# Altium PCB SmartSwitchD2_MainBoard_1v2.PCBDOC
Units mm, origin at the board's own origin, x right, y up, seen from the top; angles counter-clockwise.
Board outline 70 x 77.6 mm, 2 copper layers (Top Layer, Bottom Layer), stack 1.443 mm thick; 53 components, 27 nets, 198 pads, 183 vias.
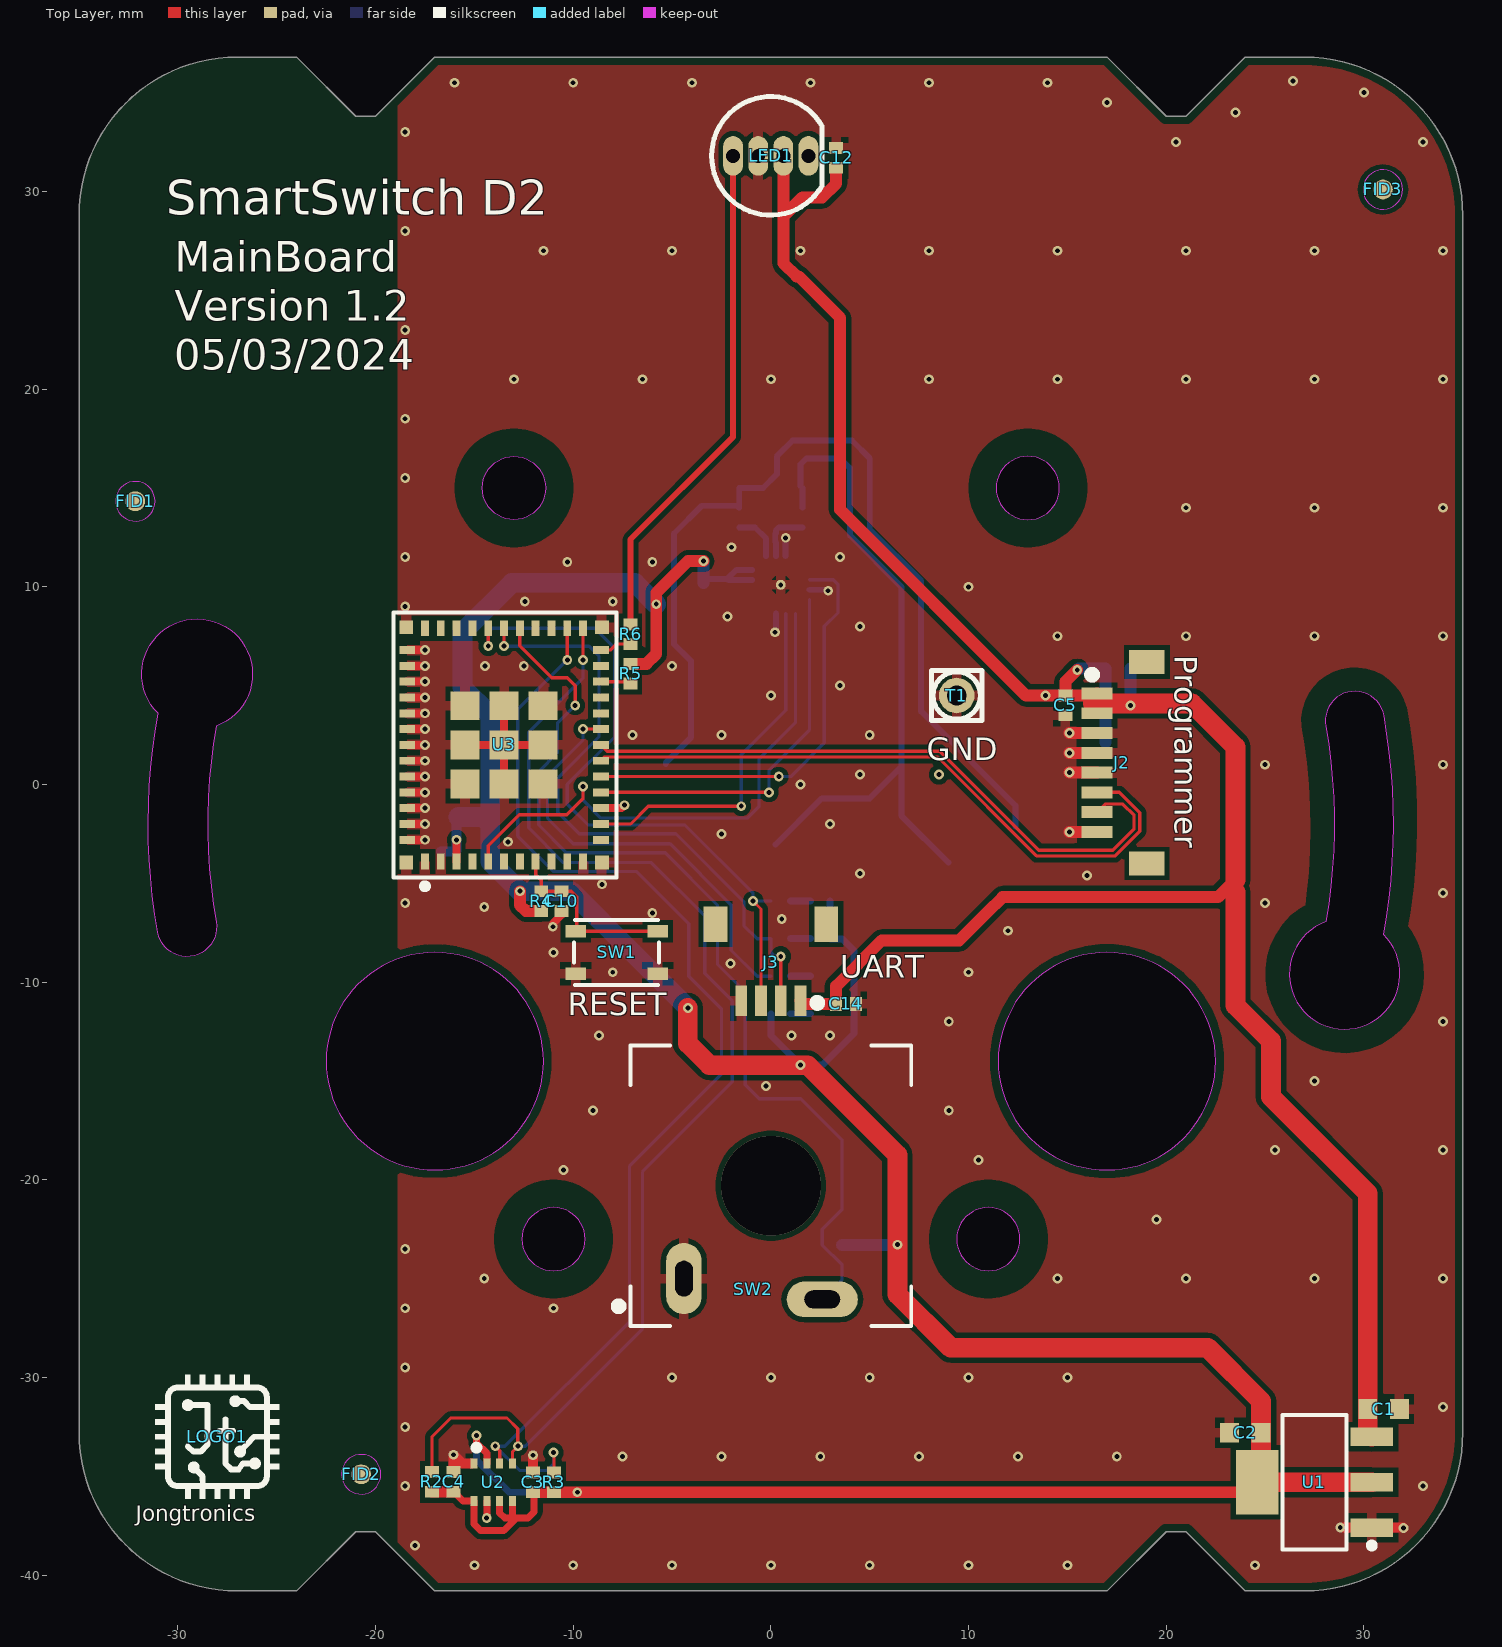
[diagram p0: Top Layer view]
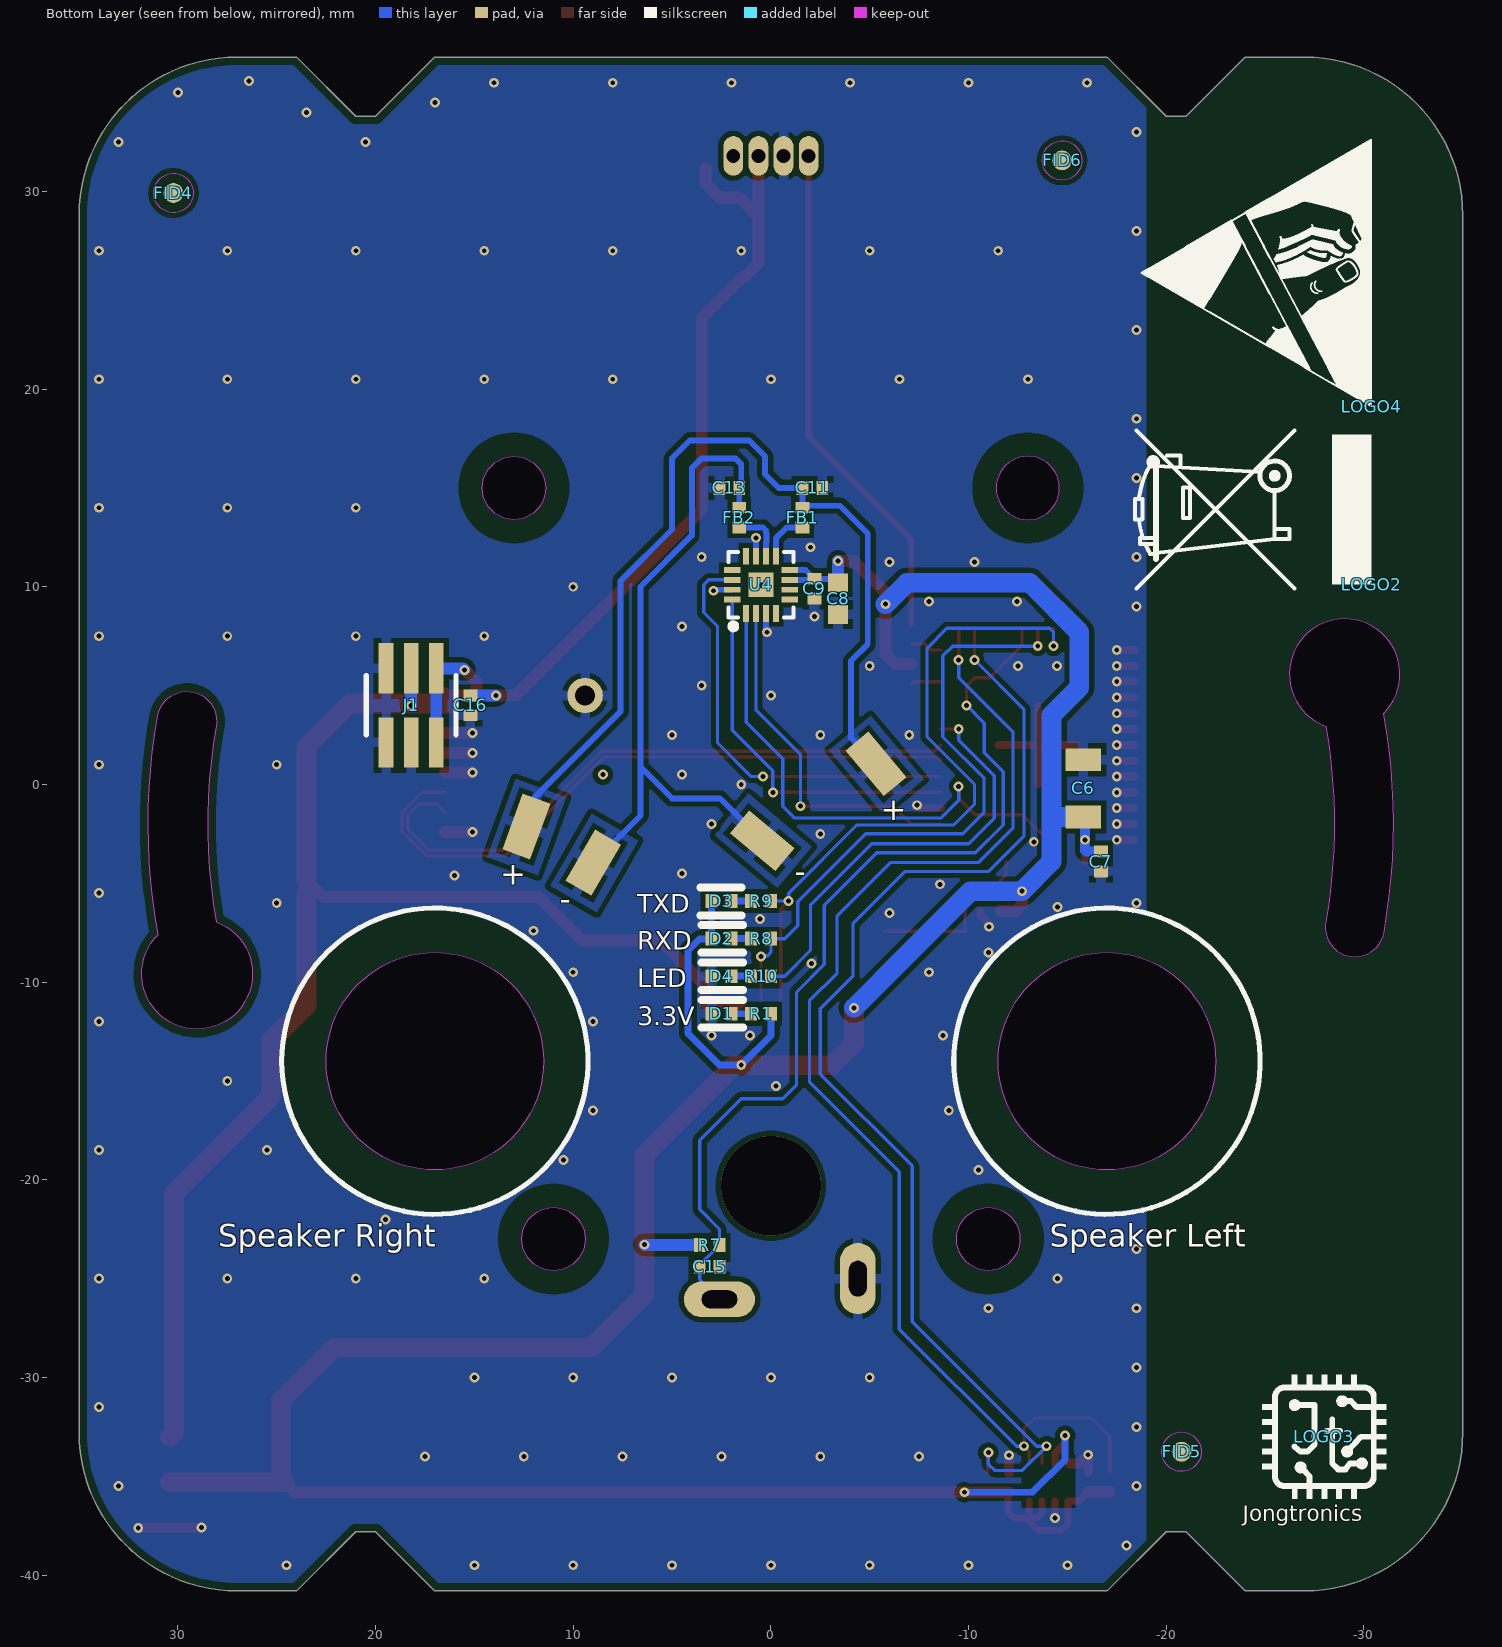
[diagram p1: Bottom Layer view, seen from below]
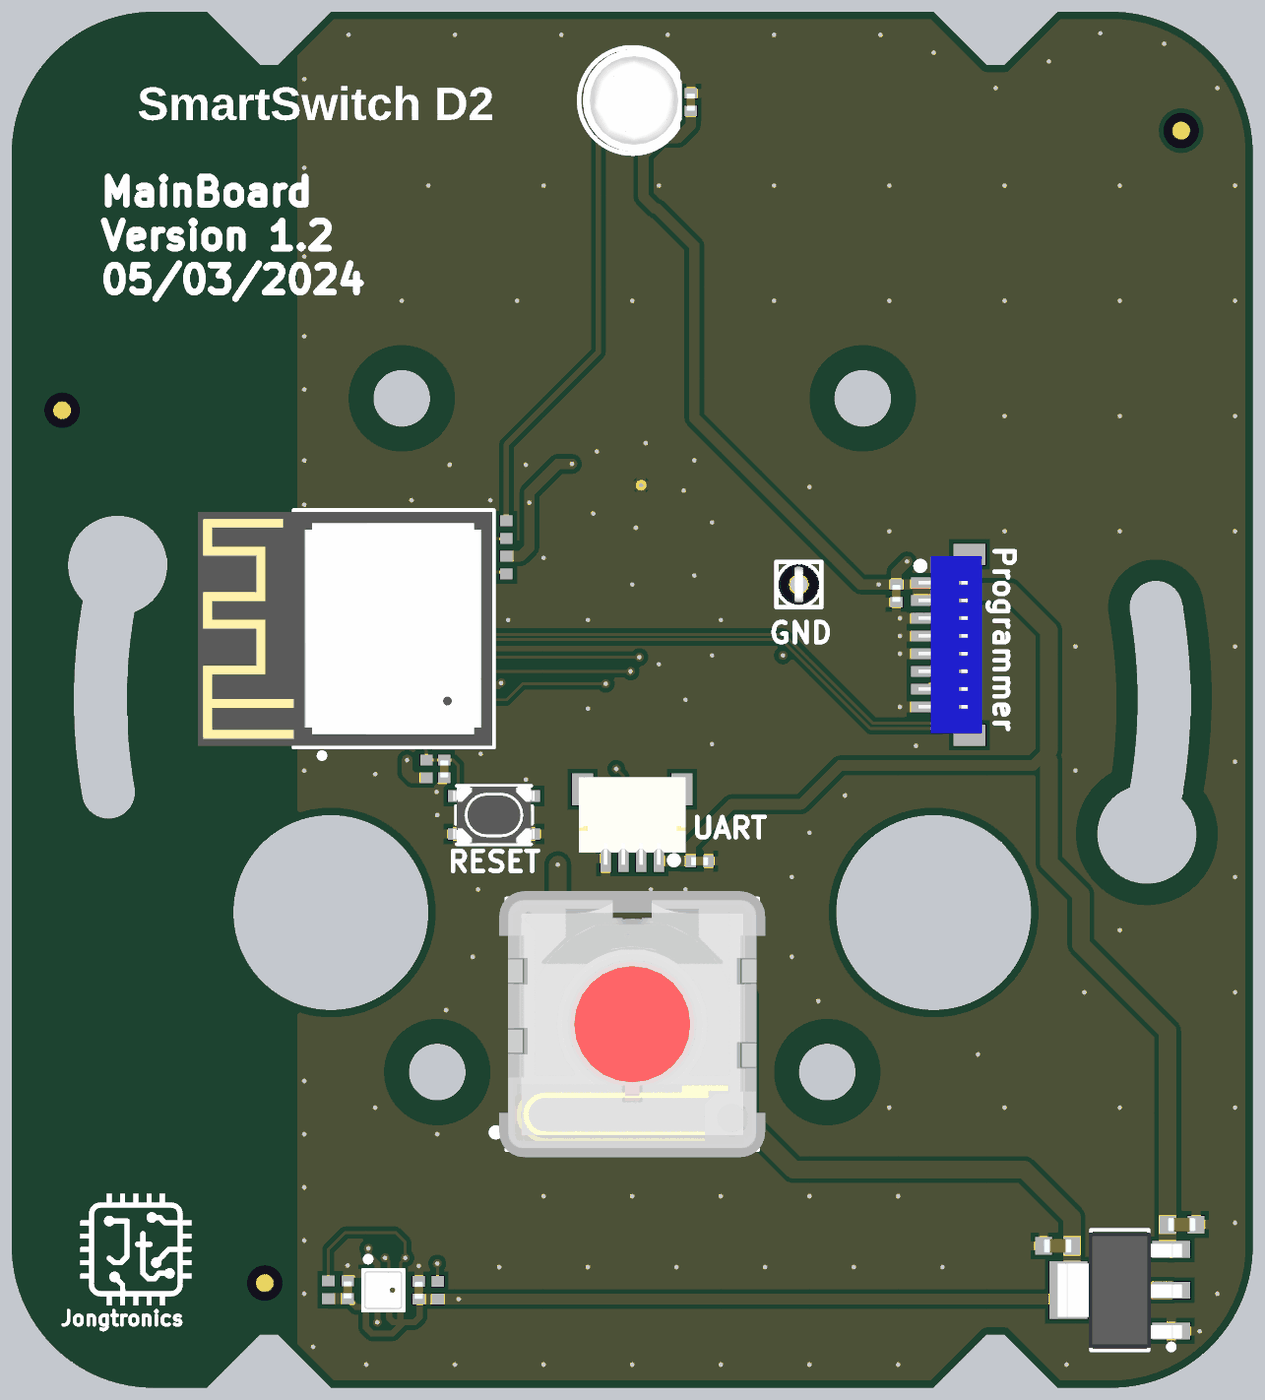
[diagram p2: 3D render of the assembled board from above, using the file's embedded part models]
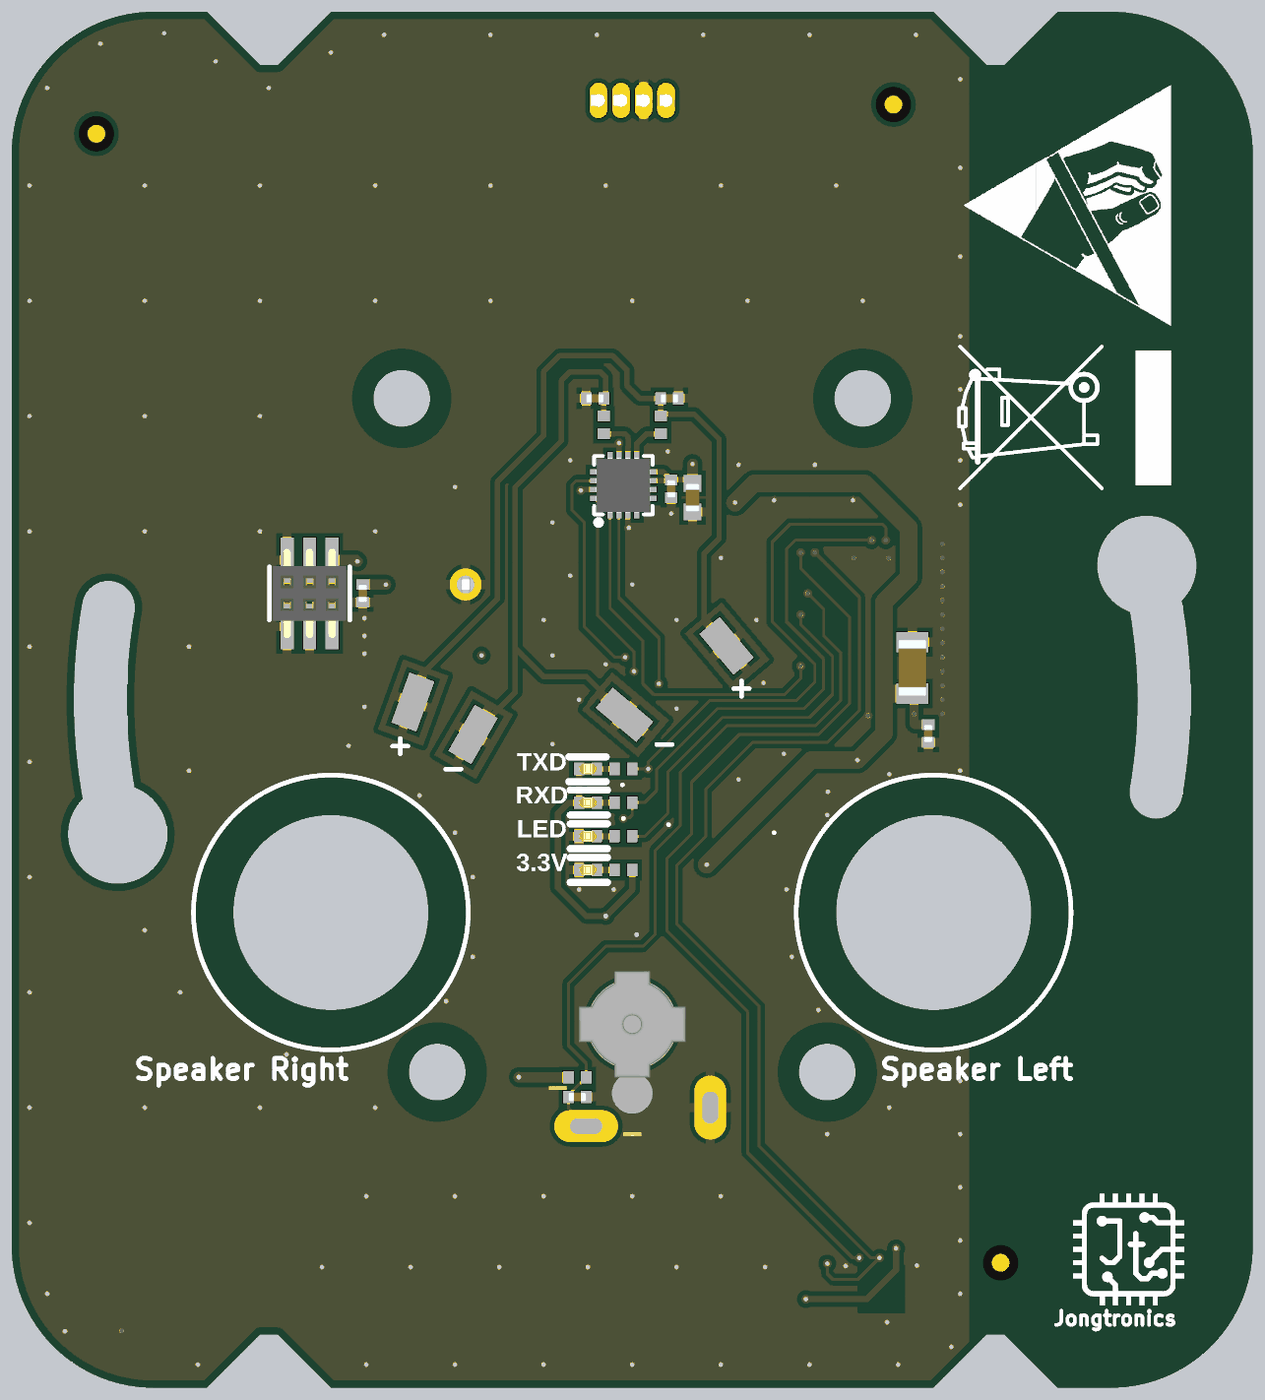
[diagram p3: 3D render of the assembled board from below, using the file's embedded part models]

## Layer stack, top to bottom
TopSolder: solder mask 0.0127, Solder Resist, Dk 3.8
Top Layer: signal copper 0.035
Dielectric 1: prepreg 0.0864, PP-011, Dk 4.29
Dielectric 2: core 1.2, FR-4, Dk 4.25
Dielectric 3: prepreg 0.0864, PP-011, Dk 4.29
Bottom Layer: signal copper 0.035
BottomSolder: solder mask 0.0127, Solder Resist, Dk 3.8

## Board outline
-27,-40.8 -24,-40.8 -21,-37.8 -20,-37.8 -17,-40.8 17,-40.8 20,-37.8 21,-37.8 24,-40.8 27,-40.8 ccw(c27,-32.8) 35,-32.8 35,28.8 ccw(c27,28.8) 27,36.8 24,36.8 21,33.8 20,33.8 17,36.8 -17,36.8 -20,33.8 -21,33.8 -24,36.8 -27,36.8 ccw(c-27,28.8) -35,28.8 -35,-32.8 ccw(c-27,-32.8)
cut-out: 11.5,-14 ccw(c17,-14) 17,-19.5 ccw(c17,-14) 22.5,-14 ccw(c17,-14) 17,-8.5 ccw(c17,-14)
cut-out: -22.5,-14 ccw(c-17,-14) -17,-19.5 ccw(c-17,-14) -11.5,-14 ccw(c-17,-14) -17,-8.5 ccw(c-17,-14)
cut-out: 11.4,15 ccw(c13,15) 13,13.4 ccw(c13,15) 14.6,15 ccw(c13,15) 13,16.6 ccw(c13,15)
cut-out: -13,13.4 cw(c-13,15) -14.6,15 cw(c-13,15) -13,16.6 cw(c-13,15) -11.4,15 cw(c-13,15)
cut-out: 9.4,-23 ccw(c11,-23) 11,-24.6 ccw(c11,-23) 12.6,-23 ccw(c11,-23) 11,-21.4 ccw(c11,-23)
cut-out: -12.6,-23 ccw(c-11,-23) -11,-24.6 ccw(c-11,-23) -9.4,-23 ccw(c-11,-23) -11,-21.4 ccw(c-11,-23)
cut-out: 28.067,-6.949 ccw(c29.027,-9.58) 31,-7.593 ccw(c0,-2) 31.021,3.47 ccw(c29.544,3.209) 28.067,2.949 cw(c0,-2)
cut-out: -31.021,-7.47 cw(c0,-2) -31,3.592 cw(c-29.027,5.579) -28.067,2.949 ccw(c0,-2) -28.067,-6.949 cw(c-29.544,-7.21)

## Design rules (kind name [scope] priority, off if disabled: settings)
BoardOutlineClearance [All] p1: gap=0.4 ignorepadtopadclearanceinfootprint=FALSE
Clearance ViaToPad [IsVia vs IsPad] p1: gap=0 ignorepadtopadclearanceinfootprint=FALSE except(0.254: SMDPad-Via)
Clearance [All] p2: gap=0.254 ignorepadtopadclearanceinfootprint=FALSE except(0.127: Arc-Arc Arc-Track Arc-SMDPad Arc-THPad Arc-Via Track-Track Track-SMDPad Track-THPad Track-Via SMDPad-SMDPad SMDPad-THPad)
ComponentClearance [All] p1: gap=0 collisioncheckmode=3 verticalgap=0 showdistances=TRUE checkcomponentboundary=TRUE
DiffPairsRouting DiffPairCAN [InDifferentialPair('CAN')] p1: maxlimit=0.165 minlimit=0.165 mostfreqgap=0.165 toplayer_minwidth=0.108 toplayer_maxwidth=0.108 toplayer_prefwidth=0.108 bottomlayer_minwidth=0.108 bottomlayer_maxwidth=0.108 bottomlayer_prefwidth=0.108 maxuncoupledlength=12.7 // 120Ohm
DiffPairsRouting DiffPairUSB [InDifferentialPair('ESP_USB')] p2: maxlimit=0.127 minlimit=0.127 mostfreqgap=0.127 toplayer_minwidth=0.206 toplayer_maxwidth=0.206 toplayer_prefwidth=0.206 bottomlayer_minwidth=0.206 bottomlayer_maxwidth=0.206 bottomlayer_prefwidth=0.206 maxuncoupledlength=12.7 // 90Ohm
FabricationTestPointUsage TestPointUsage [All] p1: valid=0 allowmultiple=FALSE
FabricationTestpoint Testpoint [All] p1: side=3 testpointundercomponent=TRUE minsize=1.016 maxsize=2.54 preferedsize=1.524 minholesize=0.508 maxholesize=1.016 preferedholesize=0.813 testpointgrid=0.025 allowsidetop=TRUE allowsidebottom=TRUE usegrid=TRUE gridtolerance=0
PlaneClearance [All] p1: clearance=0.254
PolygonConnect [All] p1: thpad.connectstyle=Relief thpad.reliefconductorwidth=0.508 thpad.reliefentries=4 thpad.polygonreliefangle="90 Angle" thpad.airgapwidth=0.254 smdpad.connectstyle=Relief smdpad.reliefconductorwidth=0.508 smdpad.reliefentries=4 smdpad.polygonreliefangle="90 Angle" smdpad.airgapwidth=0.254 via.connectstyle=Direct via.reliefconductorwidth=0.254 via.reliefentries=4 via.polygonreliefangle="90 Angle" via.airgapwidth=0.254
RoutingVias ViasPower [InNetClass('Power')] p1: holewidth=0.3 width=0.6 viastyle="Through Hole" minholewidth=0.25 minwidth=0.5 maxholewidth=0.3 maxwidth=0.6
RoutingVias Vias [All] p2: holewidth=0.25 width=0.5 viastyle="Through Hole" minholewidth=0.25 minwidth=0.5 maxholewidth=0.3 maxwidth=0.6
SilkToSolderMaskClearance SilkscreenOverComponentPads [IsPad] p1: minsilkscreentomaskgap=0.254 clearancetoexposedcopper=TRUE
SolderMaskExpansion SolderMaskExpansionVia [IsVia] p1: expansion=0 istentingtop=TRUE
SolderMaskExpansion [All] p2: expansion=0.051 istentingtop=FALSE
Width Width50Ohm [InNetClass('50Ohm')] p1: maxlimit=0.14 minlimit=0.14 preferedwidth=0.14 minimp=50.000000 maximp=50.000000 favimp=50.000000
Width WidthPower [InNetClass('Power')] p2: maxlimit=1.143 minlimit=0.203 preferedwidth=0.508 minimp=50.000000 maximp=50.000000 favimp=50.000000
Width [All] p3: maxlimit=1.143 minlimit=0.102 preferedwidth=0.165 minimp=50.000000 maximp=50.000000 favimp=50.000000
24 further rules are at their usual default settings.

## Classes and differential pairs
net class Power: GND P3V3A VCC
differential pair USB_D: +USB_D_P -USB_D_N

## Components (designator, comment, footprint, x,y, rotation, side; value= is the part's Value field where it differs from the comment)
C1 "CAP-0603 10uF 35VDC 20% X5R" C0603 31,-31.6 r180 top value=10uF
C2 "CAP-0603 10uF 35VDC 20% X5R" C0603 24,-32.8 r0 top value=10uF
C3 "CAP-0402 100nF 50VDC 10% X7R" C0402 -12.04,-35.306 r270 top value=100nF
C4 "CAP-0402 100nF 50VDC 10% X7R" C0402 -16.053,-35.281 r270 top value=100nF
C5 "CAP-0402 100nF 50VDC 10% X7R" C0402 14.9,4 r90 top value=100nF
C6 "CAP-1206 22uF 25VDC 10% X5R" C1206 -15.8,-0.2 r270 bottom value=22uF
C7 "CAP-0402 100nF 50VDC 10% X7R" C0402 -16.7,-3.9 r90 bottom value=100nF
C8 "CAP-0603 10uF 35VDC 20% X5R" C0603 -3.4,9.4 r90 bottom value=10uF
C9 "CAP-0402 100nF 50VDC 10% X7R" C0402 -2.2,9.9 r90 bottom value=100nF
C10 "CAP-0402 100nF 50VDC 10% X7R" C0402 -10.6,-5.9 r90 top value=100nF
C11 "CAP-0402 220pF 50VDC 10% X7R" C0402 -2.1,15 r0 bottom value=220pF
C12 "CAP-0402 100nF 50VDC 10% X7R" C0402 3.3,31.7 r270 top value=100nF
C13 "CAP-0402 220pF 50VDC 10% X7R" C0402 2.1,15 r180 bottom value=220pF
C14 "CAP-0402 100nF 50VDC 10% X7R" C0402 3.8,-11.1 r180 top value=100nF
C15 "CAP-0402 100nF 50VDC 10% X7R" C0402 3.1,-24.4 r0 bottom value=100nF
C16 "CAP-0402 100nF 50VDC 10% X7R" C0402 15.2,4 r90 bottom value=100nF
D1 "LED-0402 Red 1.8V 1mA" LED0402 2.5,-11.6 r180 bottom value=1mA
D2 "LED-0402 Red 1.8V 1mA" LED0402 2.5,-7.8 r0 bottom value=1mA
D3 "LED-0402 Yellow 1.9V 1mA" LED0402 2.5,-5.9 r0 bottom value=1mA
D4 "LED-0402 Blue 2.65V 2mA" LED0402 2.5,-9.7 r180 bottom value=2mA
FB1 "FB-0402 120R 0.55A 250mOhms" FB0402 -1.6,13.5 r90 bottom value=120Ohm
FB2 "FB-0402 120R 0.55A 250mOhms" FB0402 1.6,13.5 r90 bottom value=120Ohm
FID1 "Fiducial" FIDUCIAL -32.156,14.326 r90 top
FID2 "Fiducial" FIDUCIAL -20.726,-34.9 r90 top
FID3 "Fiducial" FIDUCIAL 30.963,30.099 r90 top
FID4 "Fiducial" FIDUCIAL 30.226,29.921 r90 bottom
FID5 "Fiducial" FIDUCIAL -20.777,-33.757 r90 bottom
FID6 "Fiducial" FIDUCIAL -14.732,31.572 r90 bottom
J1 "Header Female 2x3 - 4.6mm height - 0.05\" (1.27mm)" "HEADER FEMALE 2x3 1.27MM" 18.2,4 r0 bottom locked
J2 "PCB Connector JST SH1.0mm pitch SMD 1x8 Top Entry" BM08B-SRSS-TB 17.762,1.1 r270 top
J3 "PCB Connector JST SH1.0mm pitch SMD 1x4 Side Entry" SM04B-SRSS-TB 0,-9 r180 top locked
LED1 "LED RGB 256 Levels 5V 5mm" "WS2811 DIP" 0,31.8 r0 top locked
LOGO1 "Logo Jongtronics" LOGO_JONGTRONICS -28,-33 r0 top
LOGO2 "Logo Trash" LOGO_TRASH -30.4,10.1 r90 bottom
LOGO3 "Logo Jongtronics" LOGO_JONGTRONICS -28,-33 r180 bottom
LOGO4 "Logo ESD" LOGO_ESD -30.4,19.1 r90 bottom
R1 "RES-0402 2.2k 50V 1% 62.5mW" R0402 0.5,-11.6 r180 bottom value=2.2kOhm
R2 "RES-0402 2.2k 50V 1% 62.5mW" R0402 -17.145,-35.281 r270 top value=2.2kOhm
R3 "RES-0402 2.2k 50V 1% 62.5mW" R0402 -10.973,-35.306 r270 top value=2.2kOhm
R4 "RES-0402 10k 50V 1% 62.5mW" R0402 -11.616,-5.9 r270 top value=10kOhm
R5 "RES-0402 10k 50V 1% 62.5mW" R0402 -7.1,5.6 r90 top value=10kOhm
R6 "RES-0402 470R 50V 1% 62.5mW" R0402 -7.1,7.6 r270 top value=470Ohm
R7 "RES-0402 1k 50V 1% 125mW" R0402 3.1,-23.3 r0 bottom value=1kOhm
R8 "RES-0402 1k 50V 1% 125mW" R0402 0.5,-7.8 r0 bottom value=1kOhm
R9 "RES-0402 1k 50V 1% 125mW" R0402 0.5,-5.9 r0 bottom value=1kOhm
R10 "RES-0402 1k 50V 1% 125mW" R0402 0.5,-9.7 r180 bottom value=1kOhm
SW1 "Tactile Switch SMD/SMT PTS815" "SW PTS815 SJK 250" -7.8,-8.5 r180 top
SW2 "Gateron KS-27 Low Profile 2.0 Mechanical Switch Set" "GATERON KS-27" 0,-20.3 r0 top locked
T1 "PCB Test point BLACK 1mm hole" "TESTPIN BLACK 1MM" 9.4,4.5 r0 top
U1 "Linear LDO 3.3V 800mA" SOT-223-4 27.5,-35.3 r90 top
U2 "Digital Sensor Temperature,Humidity,Pressure" LGA-8 -14.046,-35.3 r90 top
U3 "2.4 GHz WiFi, Bluetooth 5 (LE), Zigbee and Thread module" ESP32-CX-MINI-1 -13.5,2 r90 top locked
U4 "Tiny, Low-Cost, PCM Class D Amplifier" TQFN-16 0.5,10.1 r90 bottom

## Footprints (in the part's own frame and the unit in brackets; to place one, negate y for a bottom-side part, rotate by r counter-clockwise, add the part's x,y. Pads: shape width x height; smd on the part's side, far side on the other; paste and mask are expansions set on the pad)
BM08B-SRSS-TB [mm]
  rect 0.6x1.55 smd: 1(-3.5,-1.262) 2(-2.5,-1.262) 3(-1.5,-1.262) 4(-0.5,-1.262) 5(0.5,-1.262) 6(1.5,-1.262) 7(2.5,-1.262) 8(3.5,-1.262)
  rect 1.2x1.8 smd: ""(-5.1,1.263) ""(5.1,1.263)
  silkscreen extent -4.65,-1.71 -4.25,-1.31, body extent -5,-1.63 5,1.97, height 4.25
C0402 [mm] "C0402"
  rect 0.6x0.7 smd: 1(-0.5,0) 2(0.5,0)
  body extent -0.5,-0.25 0.5,0.25, height 0.55
C0603 [mm] "C0603"
  rect 0.95x1 smd: 1(-0.8,0) 2(0.8,0)
  body extent -0.8,-0.4 0.8,0.4, height 0.87
C1206 [mm] "C1206"
  rect 1.15x1.8 smd: 1(-1.45,0) 2(1.45,0)
  body extent -1.6,-0.8 1.6,0.8, height 0.88
ESP32-CX-MINI-1 [mm]
  rect 0.8x0.4 smd: 1(-5.9,4) 2(-5.9,3.2) 3(-5.9,2.4) 4(-5.9,1.6) 5(-5.9,0.8) 6(-5.9,0) 7(-5.9,-0.8) 8(-5.9,-1.6) 9(-5.9,-2.4) 10(-5.9,-3.2) 11(-5.9,-4) 25(5.9,-4) 26(5.9,-3.2) 27(5.9,-2.4) 28(5.9,-1.6) 29(5.9,-0.8) 30(5.9,0) 31(5.9,0.8) 32(5.9,1.6) 33(5.9,2.4) 34(5.9,3.2) 35(5.9,4)
  rect 0.4x0.8 smd: 12(-4.8,-4.9) 13(-4,-4.9) 14(-3.2,-4.9) 15(-2.4,-4.9) 16(-1.6,-4.9) 17(-0.8,-4.9) 18(0,-4.9) 19(0.8,-4.9) 20(1.6,-4.9) 21(2.4,-4.9) 22(3.2,-4.9) 23(4,-4.9) 24(4.8,-4.9) 36(4.8,4.9) 37(4,4.9) 38(3.2,4.9) 39(2.4,4.9) 40(1.6,4.9) 41(0.8,4.9) 42(0,4.9) 43(-0.8,4.9) 44(-1.6,4.9) 45(-2.4,4.9) 46(-3.2,4.9) 47(-4,4.9) 48(-4.8,4.9)
  rect 1.45x1.45 smd: 49(-1.975,-1.975) 49(-1.975,0) 49(-1.975,1.975) 49(0,1.975) 49(0,0) 49(0,-1.975) 49(1.975,-1.975) 49(1.975,0) 49(1.975,1.975)
  rect 0.7x0.7 smd: 50(5.95,4.95) 51(5.95,-4.95) 52(-5.95,-4.95) 53(-5.95,4.95)
  silkscreen extent -7.3,-5.7 6.7,5.6, body extent -6.6,-5.6 6.6,11, height 2.4
FB0402 [mm]
  rect 0.6x0.7 smd: 1(-0.5,0) 2(0.5,0)
  body extent -0.55,-0.3 0.55,0.3, height 0.5
FIDUCIAL [mm]
  round 1 smd paste-1 mask+0.5: 1(0,0)
  Top Layer keep-out circle w0.01: c0,0 r1
"GATERON KS-27" [mm]
  oval 1.8x3.6 hole 0.9 slot 1.8 at 90 deg mask+0: 1(-4.4,-4.7)
  oval 3.6x1.8 hole 0.9 slot 1.8 at 0 deg mask+0: 2(2.6,-5.75)
  silkscreen extent -7.9,-7.1 7.1,7.1, body extent -7.5,-7.5 7.5,7.5, height 8.8
"HEADER FEMALE 2x3 1.27MM" [mm]
  rect 0.74x2.55 smd: 1(-1.27,-1.875) 2(-1.27,1.875) 3(0,-1.875) 4(0,1.875) 5(1.27,-1.875) 6(1.27,1.875)
  silkscreen extent -2.27,-1.5 2.27,1.5, body extent -2.08,-2.52 2.08,2.52, height 4.68
LED0402 [mm]
  rect 0.6x0.7 smd: 1(-0.5,0) 2(0.5,0)
  body extent -0.5,-0.3 0.5,0.3, height 0.2
LGA-8 [mm]
  rect 0.5x0.35 smd: 1(0.95,0.975) 2(0.95,0.325) 3(0.95,-0.325) 4(0.95,-0.975) 5(-0.95,-0.975) 6(-0.95,-0.325) 7(-0.95,0.325) 8(-0.95,0.975)
  silkscreen extent 1.6,0.7 1.9,1, body extent -1.25,-1.25 1.25,1.25, height 0.97
LOGO_ESD [mm]
  silkscreen extent 0,0 13.56,11.68
LOGO_JONGTRONICS [mm]
  silkscreen extent -3.15,-3.15 3.15,3.15
LOGO_TRASH [mm]
  silkscreen extent -0.18,0 7.82,11.97
R0402 [mm] "R0402"
  rect 0.6x0.7 smd: 1(-0.5,0) 2(0.5,0)
  body extent -0.55,-0.3 0.55,0.3, height 0.35
SM04B-SRSS-TB [mm]
  rect 0.6x1.55 smd: 1(-1.5,1.937) 2(-0.5,1.937) 3(0.5,1.937) 4(1.5,1.937)
  rect 1.2x1.8 smd: ""(-2.8,-1.937) ""(2.8,-1.937)
  silkscreen extent -2.55,1.85 -2.15,2.25, body extent -3,-2.64 3,2.31, height 2.96
SOT-223-4 [mm]
  rect 0.95x2.15 smd: 1(-2.3,-2.9) 2(0,-2.9) 3(2.3,-2.9)
  rect 3.25x2.15 smd: 4(0,2.9)
  silkscreen extent -3.4,-3.05 3.4,1.62, body extent -3.25,-3.5 3.25,3.5, height 1.68
"SW PTS815 SJK 250" [mm]
  rect 1.05x0.65 smd: 1(-2.075,1.075) 1(2.075,1.075) 2(-2.075,-1.075) 2(2.075,-1.075)
  silkscreen extent -2.15,-1.65 2.15,1.65, body extent -2.3,-1.6 2.3,1.6, height 2.5
"TESTPIN BLACK 1MM" [mm]
  round 1.8 hole 1 mask+0: 1(0,0)
  silkscreen extent -1.27,-1.27 1.27,1.27, body extent -1.15,-1.15 1.15,1.15, height 5
TQFN-16 [mm]
  rect 0.85x0.3 smd: 1(-1.45,0.75) 2(-1.45,0.25) 3(-1.45,-0.25) 4(-1.45,-0.75) 9(1.45,-0.75) 10(1.45,-0.25) 11(1.45,0.25) 12(1.45,0.75)
  rect 0.3x0.85 smd: 5(-0.75,-1.45) 6(-0.25,-1.45) 7(0.25,-1.45) 8(0.75,-1.45) 13(0.75,1.45) 14(0.25,1.45) 15(-0.25,1.45) 16(-0.75,1.45)
  rect 1.25x1.25 smd: 17(0,0)
  silkscreen extent -2.25,-1.65 1.65,1.65, body extent -1.55,-1.55 1.55,1.55, height 0.8
"WS2811 DIP" [mm]
  oval 1x2 hole 0.7: 1(1.9,0) 2(0.63,0) 3(-0.64,0) 4(-1.91,0)
  silkscreen extent -3,-3 2.59,3, body extent -2.8,-2.9 2.8,2.9, height 13.8

## Part data
C1 C2 C8: library part "C 0603 10uF 35V", Case-EIA=0603, Case-Metric=1608, Manufacturer 1="Murata Electronics", Manufacturer Part Number 1=GRM188R6YA106MA73D, Rated Voltage=35V, Supplier Part Number 1=81-GRM188R6YA106MA3D, Tolerance=20%, Datasheet=https://nl.mouser.com/datasheet/2/281/murata_03052018_GRM_Series_1-1310166.pdf, Default Designator=C?, Part Number="C 0603 10uF 35V", Supplier 1=Mouser
C3 C4 C5 C7 C9 C10 C12 C14 C15 C16: library part "C 0402 100nF 50V", Case-EIA=0402, Case-Metric=1005, Manufacturer 1="KYOCERA AVX", Manufacturer Part Number 1=04025C104KAT4A, Rated Voltage=50V, Supplier Part Number 1=581-04025C104KAT4A, Tolerance=10%, Datasheet=https://nl.mouser.com/datasheet/2/40/AVX_X7RDielectric_777024-1853642.pdf, Default Designator=C?, Part Number="C 0402 100nF 50V", Supplier 1=Mouser
C6: library part "C 1206 22uF 25V", "CAP-1206 47uF 16VDC 20% X5R", Case-EIA=1206, Case-Metric=3216, Manufacturer 1="Samsung Electro-Mechanics", Manufacturer Part Number 1=CL31A226KAHNNNE, Rated Voltage=25V, Supplier Part Number 1=187-CL31A226KAHNNNE, Tolerance=10%, Datasheet=https://nl.mouser.com/datasheet/2/585/MLCC-1837944.pdf, Default Designator=C?, Part Number="C 1206 22uF 25V", Supplier 1=Mouser
C11 C13: library part "C 0402 220pF 50V", Case-EIA=0402, Case-Metric=1005, Manufacturer 1="Murata Electronics", Manufacturer Part Number 1=GCM155R71H221KA37J, Rated Voltage=50V, Supplier Part Number 1=81-GCM155R71H221KA7J, Tolerance=10%, Datasheet=https://nl.mouser.com/datasheet/2/281/murata_03122018_GCM_Series-1310150.pdf, Default Designator=C?, Part Number="C 0402 220pF 50V", Supplier 1=Mouser
D1 D2: library part "LED 0402 Red", Case-EIA=0402, Case-Metric=1005, Manufacturer 1="Rohm Semiconductor", Manufacturer Part Number 1=SML-P11UTT86R, Rated Voltage=1.8V, Supplier Part Number 1=SML-P11UTT86RTR-ND, Datasheet=https://fscdn.rohm.com/en/products/databook/datasheet/opto/led/chip_mono/sml-p11-e.pdf, Default Designator=D?, Part Number="LED 0402 Red", Supplier 1=Digi-Key
D3: library part "LED 0402 Yellow", Case-EIA=0402, Case-Metric=1005, Manufacturer 1="Rohm Semiconductor", Manufacturer Part Number 1=SML-P11YTT86, Rated Voltage=1.9V, Supplier Part Number 1=846-SML-P11YTT86TR-ND, Datasheet=https://fscdn.rohm.com/en/products/databook/datasheet/opto/led/chip_mono/sml-p11-e.pdf, Default Designator=D?, Part Number="LED 0402 Yellow", Supplier 1=Digi-Key
D4: library part "LED 0402 Blue", Case-EIA=0402, Case-Metric=1005, Manufacturer 1=Kingbright, Manufacturer Part Number 1=APHHS1005LQBC/D-V, Rated Voltage=2.65V, Supplier Part Number 1=754-2122-2-ND, Datasheet=https://www.kingbrightusa.com/images/catalog/SPEC/APHHS1005LQBC-D-V.pdf, Default Designator=D?, Part Number="LED 0402 Blue", Supplier 1=Digi-Key
FB1 FB2: library part "FB 0402 120Ohm", Case-EIA=0402, Case-Metric=1005, Manufacturer 1="Murata Electronics", Manufacturer Part Number 1=BLM15AG121SN1D, Supplier Part Number 1=81-BLM15AG121SN1D, Tolerance=25%, Datasheet=https://nl.mouser.com/datasheet/2/281/ENFA0018-1915754.pdf, Default Designator=FB?, Part Number="FB 0402 120Ohm", Supplier 1=Mouser
J1: library part "Header Female 2x3 0.05\" (1.27mm)", Manufacturer 1=Harwin, Manufacturer Part Number 1=M50-3100345, Supplier Part Number 1=855-M50-3100345, Datasheet=https://nl.mouser.com/datasheet/2/181/M50_310-1221016.pdf, Default Designator=J?, Part Number="Header Female 2x3 0.05\" (1.27mm)", Supplier 1=Mouser
J2: library part "Conn 1x8 JST SH1.0 Top Entry", Manufacturer 1="JST Sales America Inc.", Manufacturer Part Number 1=BM08B-SRSS-TB, Supplier Part Number 1=455-1412-1-ND, Datasheet=https://media.digikey.com/pdf/Data%20Sheets/JST%20PDFs/SR%20Connector.pdf, Default Designator=J?, Part Number="Conn 1x8 JST SH1.0 Top Entry", Supplier 1=Digi-Key
J3: library part "Conn 1x4 JST SH1.0 Side Entry", Manufacturer 1="JST Sales America Inc.", Manufacturer Part Number 1=SM04B-SRSS-TB, Supplier Part Number 1=455-SM04B-SRSS-TBTR-ND, Datasheet=https://www.jst-mfg.com/product/pdf/eng/eSH.pdf, Default Designator=J?, Part Number="Conn 1x4 JST SH1.0 Side Entry", Supplier 1=Digi-Key
LED1: library part "LED WS2811", Default Designator=LED?, Part Number="LED WS2811"
R1 R2 R3: library part "R 0402 2.2kOhm", Case-EIA=0402, Case-Metric=1005, Manufacturer 1="Vishay / Dale", Manufacturer Part Number 1=CRCW04022K20FKEDC, Rated Voltage=50V, Supplier Part Number 1=71-CRCW04022K20FKEDC, Tolerance=1%, Datasheet=https://nl.mouser.com/datasheet/2/447/PYu-RC_Group_51_RoHS_L_10-1527934.pdf, Default Designator=R?, Part Number="R 0402 2.2kOhm", Supplier 1=Mouser
R4 R5: library part "R 0402 10kOhm", Case-EIA=0402, Case-Metric=1005, Manufacturer 1="Vishay / Dale", Manufacturer Part Number 1=CRCW040210K0FKEDC, Rated Voltage=50V, Supplier Part Number 1=71-CRCW040210K0FKEDC, Tolerance=1%, Datasheet=https://nl.mouser.com/datasheet/2/427/crcwce3-1223726.pdf, Default Designator=R?, Part Number="R 0402 10kOhm", Supplier 1=Mouser
R6: library part "R 0402 470Ohm", Case-EIA=0402, Case-Metric=1005, Manufacturer 1=Bourns, Manufacturer Part Number 1=CR0402-FX-4700GLF, Rated Voltage=50V, Supplier Part Number 1=652-CR0402FX-4700GLF, Tolerance=1%, Datasheet=https://nl.mouser.com/datasheet/2/54/cr-1858361.pdf, Default Designator=R?, Part Number="R 0402 470Ohm", Supplier 1=Mouser
R7 R8 R9 R10: library part "R 0402 1kOhm", Case-EIA=0402, Case-Metric=1005, Manufacturer 1=Yageo, Manufacturer Part Number 1=RC0402FR-7W1KL, Rated Voltage=50V, Supplier Part Number 1=603-RC0402FR-7W1KL, Tolerance=1%, Datasheet=https://nl.mouser.com/datasheet/2/447/PYu-RC_Group_51_RoHS_L_10-1527934.pdf, Default Designator=R?, Part Number="R 0402 1kOhm", Supplier 1=Mouser
SW1: library part "SW Tactile PTS815", Manufacturer 1=C&K, Manufacturer Part Number 1="PTS815 SJK 250 SMTR LFS", Supplier Part Number 1=611-PTS815SJK250SMTR, Datasheet=https://nl.mouser.com/datasheet/2/240/pts815-3050953.pdf, Default Designator=SW?, Part Number="SW Tactile PTS815", Supplier 1=Mouser
SW2: library part "Gateron KS-27", Manufacturer 1=Gateron, Manufacturer Part Number 1=KS-27, Datasheet=https://cdn.shopify.com/s/files/1/0565/8070/2297/files/SPEC-KS-27C10B050NN-X5-Low_Profile_Blue_Switch.pdf?v=1667274518, Default Designator=SW?, Part Number="Gateron KS-27"
T1: library part "Testpoint BLACK", Manufacturer 1="Keystone Electronics", Manufacturer Part Number 1=5001, Supplier Part Number 1=534-5001, Datasheet=https://nl.mouser.com/datasheet/2/215/000-5004-741320.pdf, Default Designator=T?, Part Number="Testpoint BLACK", Supplier 1=Mouser
U1: library part AMS1117, Manufacturer 1="Texas Instruments", Manufacturer Part Number 1=LM1117MPX-3.3/NOPB, Supplier Part Number 1=926-LM1117MPX3.3NOPB, Datasheet=https://www.ti.com/lit/ds/symlink/lm1117.pdf?HQS=dis-mous-null-mousermode-dsf-pf-null-wwe&ts=1663860104048&ref_url=https%253A%252F%252Fwww.mouser.fi%252F, Default Designator=U?, Part Number=AMS1117, Supplier 1=Mouser
U2: library part BME280, Manufacturer 1=Bosch, Supplier Part Number 1=262-BME280, Datasheet=https://www.mouser.com/datasheet/2/783/BST-BME280-DS002-1509607.pdf, Default Designator=U?, Manufacturer Part Number 1=BME280, Part Number=BME280, Supplier 1=Mouser
U3: library part ESP32-C6-MINI-1, Manufacturer 1="Espressif Systems", Manufacturer Part Number 1=ESP32-C6-MINI-1-N4, Supplier Part Number 1=356-ESP32C6MINI-1-N4, Datasheet=https://www.espressif.com/sites/default/files/documentation/esp32-c6-mini-1_mini-1u_datasheet_en.pdf, Default Designator=U?, Part Number=ESP32-C6-MINI-1, Supplier 1=Mouser
U4: library part MAX98357A, Manufacturer 1="Analog Devices", Manufacturer Part Number 1=MAX98357AETE+T, Supplier Part Number 1=700-MAX98357AETE+T, Datasheet=https://nl.mouser.com/datasheet/2/609/MAX98357A_MAX98357B-3131172.pdf, Default Designator=U?, Part Number=MAX98357A, Supplier 1=Mouser
FID1 FID2 FID3 FID4 FID5 FID6: Default Designator=FID?, Part Number=Fiducial
LOGO1 LOGO3: Default Designator=LOGO?, Part Number="Logo Jongtronics"
LOGO2: Default Designator=LOGO?, Part Number="Logo Trash"
LOGO4: Default Designator=LOGO?, Part Number="Logo ESD"

## Free pads (board coordinates)
  rect 1.5x3 smd far side rot 140: ""(-5.319,1.042)
  rect 1.5x3 smd far side rot 130: ""(0.437,-2.848)
  round 0.5 hole 0.25: ""(0.5,10.1)
  rect 1.5x3 smd far side rot 30: ""(8.983,-3.958)
  rect 1.5x3 smd far side rot 20: ""(12.373,-2.13)

## Via types
v1: diameter 0.5, hole 0.25, Top Layer to Bottom Layer, tented both sides, 182 vias
v2: diameter 5.05, hole 5.05, Top Layer to Bottom Layer, 1 vias

## Nets (pads, with @x,y where several pads share a name; then routed paths per layer and width w, separated by ;. In a path a pad name is that pad's centre, name@x,y a point inside that pad or via, vN(x,y) a via of type N, cw(c..) or ccw(c..) an arc to the next point about the centre after c; other vN are vias at no path point)
BCLK: U3.15 U4.16 | length 19.1
  Top Layer w0.165: U3.15 v1(-0.1,-0.4)
  Bottom Layer w0.165: v1(-0.1,-0.4) -0.1,0.7 1.95,2.75 U4.16
BUTTON: C15.2 R7.1 SW2.2 U3.29 | length 48.1
  Top Layer w0.165: U3.29 -12.7,7.017 -11.083,5.4 -10.3,5.4 -9.9,5 v1(-9.9,4)
  Bottom Layer w0.165: v1(-9.9,4) -10.8,3.1 -10.8,1.6 -11.75,0.65 -11.75,-2.05 -10.35,-3.45 -5.35,-3.45 -2.7,-6.1 -2.7,-9.1 -1.3,-10.5 -1.3,-15.2 -0.6,-15.9 1.5,-15.9 3.6,-18 3.6,-21.5 2.6,-22.5 R7.1 3.6,-24.3 C15.2 3.6,-25.05 SW2.2
DIN: U3.5 U4.1 | length 27.9
  Top Layer w0.165: U3.5 -14.3,-3.1 -12.727,-1.527 -10.327,-1.527 -9.5,-0.7 v1(-9.5,-0.1)
  Bottom Layer w0.165: v1(-9.5,-0.1) -9.5,-0.8 -8.6,-1.7 -1.2,-1.7 -0.6,-1.1 -0.6,1.3 1.25,3.15 U4.1
EN: C10.2 R4.1 SW1.2 U3.8 | length 9.5
  Top Layer w0.165: U3.8 -11.9,-4.568 -11.616,-4.852 R4.1 C10.2 -10.1,-5.4 -9.816,-5.684 -9.816,-7.366 -9.875,-7.425 SW1.2@-5.725,-7.425
GAIN: U3.13 U4.2 | length 18.2
  Top Layer w0.165: U3.13 -7.1,-2 -6.2,-1.1 v1(-1.5,-1.1)
  Bottom Layer w0.165: v1(-1.5,-1.1) -1.5,1.5 0.75,3.75 U4.2
GND: C1.1 C2.1 C3.1 C4.1 C5.1 C6.1 C7.1 C8.1 C9.1 C10.1 C11.1 C12.1 C13.1 C14.1 C15.1 C16.1 D1.1 D4.1 J1.4 J1.5 J1.6 J2.3 J2.4 J2.5 J2.8 J3.4 LED1.3 pad.@0.5,10.1 SW1.1 SW2.1 T1.1 U1.1 U2.1 U2.7 U3.1 U3.2 U3.11 U3.14 U3.36 U3.37 U3.38 U3.39 U3.40 U3.41 U3.42 U3.43 U3.44 U3.45 U3.46 U3.47 U3.48 U3.49 U3.50 U3.51 U3.52 U3.53 U4.3 U4.11 U4.15 U4.17 | length 37.3
  Top Layer w0.35: v1(-14.376,-37.109) -14.371,-37.104 U2.7
  Top Layer w0.4: U3.48 v1(-17.496,-2.8) ; U3.47 v1(-17.496,-2) ; U3.46 v1(-17.496,-1.2) ; U3.45 v1(-17.496,-0.4) ; U3.44 v1(-17.496,0.4) ; U3.43 v1(-17.496,1.2) ; U3.42 v1(-17.496,2) ; U3.41 v1(-17.496,2.8) ; U3.40 v1(-17.496,3.6) ; U3.39 v1(-17.496,4.4) ; U3.38 v1(-17.496,5.2) ; U3.37 v1(-17.496,6) ; U3.36 v1(-17.496,6.8) ; U3.49@-15.475,2 U3.49@-13.5,2 ; U3.49@-13.5,0.025 U3.49@-13.5,2 ; U3.49@-13.5,3.975 U3.49@-13.5,2 ; U3.49@-11.525,2 U3.49@-13.5,2 ; v1(-11.033,-7.197) -11,-7.164 -11,-7 -10.6,-6.6 C10.1 ; U3.14 -7.55,-1.2 v1(-7.4,-1.05)
  Top Layer w0.5: C4.1 v1(-16.053,-33.909) -15.612,-34.35 U2.1@-15.138,-34.35 ; C3.1 v1(-12.04,-33.934) ; v1(28.804,-37.592) 28.812,-37.6 U1.1 31.987,-37.6 v1(32.004,-37.617)
  Top Layer w0.6: v1(15.1,-2.4) J2.8 ; v1(15.1,0.6) J2.5 ; v1(15.1,1.6) J2.4 ; v1(15.1,2.6) J2.3
  Bottom Layer w0.3: v1(0.2,7.7) 0.25,7.75 U4.3 ; U4.11 0.75,12.25 v1(0.75,12.479) 0.779,12.479 v1@0.8,12.5 ; U4.15 2.85,9.85 v1(2.9,9.8)
  other v1: -15,-39.5 -10,-39.5 -5,-39.5 0,-39.5 5,-39.5 10,-39.5 15,-39.5 24.5,-39.5 -18,-38.5 -18.5,-35.5 33,-35.5 -7.5,-34 -2.5,-34 2.5,-34 7.5,-34 12.5,-34 17.5,-34 -18.5,-32.5 34,-31.5 -5,-30 0,-30 5,-30 10,-30 15,-30 -18.5,-29.5 -18.5,-26.5 -11,-26.5 -14.5,-25 14.5,-25 21,-25 27.5,-25 34,-25 -18.5,-23.5 19.5,-22 -10.5,-19.5 10.5,-19 25.5,-18.5 34,-18.5 -9,-16.5 9,-16.5 -0.25,-15.25 27.5,-15 -8.7,-12.7 1.05,-12.7 3,-12.7 9,-12 34,-12 -8,-9.5 10,-9.5 -2.05,-9.05 -11,-8.5 12,-7.4 0.55,-6.8 -6,-6.5 -14.5,-6.2 -18.5,-6 25,-6 34,-5.5 -8.55,-5.05 16,-4.6 4.5,-4.5 -13.3,-2.9 -2.5,-2.5 3,-2 1.5,0 4.5,0.5 25,1 34,1 -7,2.5 -2.5,2.5 5,2.5 0,4.5 3.5,5 -14.466,5.99 -12.5,6 -5,6 14.5,7.5 21,7.5 27.5,7.5 34,7.5 4.5,8 -2.2,8.5 -18.5,9 -12.45,9.25 -8,9.25 10,10 -10.3,11.25 -6,11.25 -18.5,11.5 3.5,11.5 -2,12 21,14 27.5,14 34,14 -18.5,15.5 -18.5,18.5 -13,20.5 -6.5,20.5 0,20.5 8,20.5 14.5,20.5 21,20.5 27.5,20.5 34,20.5 -18.5,23 -11.5,27 -5,27 1.5,27 8,27 14.5,27 21,27 27.5,27 34,27 -18.5,28 20.5,32.5 33,32.5 -18.5,33 23.5,34 17,34.5 30,35 -16,35.5 -10,35.5 -4,35.5 2,35.5 8,35.5 14,35.5 26.404,35.595
GPIO8: R5.1 U3.22 | length 1.5
  Top Layer w0.165: U3.22 -7.2,5.2 R5.1
LED: R10.2 U3.19 | length 22.1
  Top Layer w0.165: v1(-9.504,2.8) U3.19
  Bottom Layer w0.165: v1(-9.504,2.8) -9.504,2.246 -11.3,0.45 -11.3,-1.7 -10,-3 -5.1,-3 -2,-6.1 -2,-8.4 -0.7,-9.7 R10.2
LRCLK: U3.16 U4.14 | length 21.8
  Top Layer w0.165: U3.16 v1(0.4,0.4)
  Bottom Layer w0.165: v1(0.4,0.4) 1,0.4 2.7,2.1 2.7,8 3.4,8.7 3.4,10.1 3.15,10.35 U4.14
NetD1_2: D1.2 R1.1 | length 1
  Bottom Layer w0.35: R1.1 D1.2
NetD2_1: D2.1 R8.2 | length 1
  Bottom Layer w0.35: R8.2 D2.1
NetD3_1: D3.1 R9.2 | length 1
  Bottom Layer w0.35: R9.2 D3.1
NetD4_2: D4.2 R10.1 | length 1
  Bottom Layer w0.35: R10.1 D4.2
OUTN_R: FB2.1 U4.10 | length 2.7
  Bottom Layer w0.3: U4.10 0.25,12.231 0.221,12.26 0.221,12.698 0.25,12.727 0.25,12.85 0.4,13 0.523,13 0.531,13.008 0.969,13.008 0.977,13 FB2.1
OUTN_R_F: C13.2 FB2.2 pad.@0.437,-2.848 pad.@8.983,-3.958 | length 35.1
  Bottom Layer w0.3: pad.@0.233,-3.044 2.577,-0.7 5,-0.7 6.6,0.9 ; FB2.2 C13.2 1.5,15.1 1.5,16.2 1.8,16.5 3.5,16.5 4,16 4,12.6 6.6,10 6.6,0.9 ; pad.@8.983,-3.958 6.6,-1.575 6.6,0.9
OUTP_R: FB1.1 U4.9 | length 2.5
  Bottom Layer w0.3: FB1.1 -0.8,13 -0.25,12.45 U4.9
OUTP_R_F: C11.2 FB1.2 pad.@12.373,-2.13 pad.@-5.319,1.042 | length 47.6
  Bottom Layer w0.3: pad.@-5.319,1.042 -5.319,1.098 -4.05,2.367 -4.05,6.25 -4.9,7.1 -4.9,12.7 -3.5,14.1 -1.7,14.1 FB1.2 C11.2 ; C11.2 -0.4,15 0.3,15.7 0.3,16.6 1.1,17.4 4.1,17.4 5,16.5 5,12.9 7.6,10.3 7.6,3.7 12.373,-1.073 pad.@12.373,-2.13
P3V3A: C2.2 C3.2 C4.2 C6.2 C7.2 C8.2 C9.2 D2.2 D3.2 R1.2 R2.2 R3.2 R4.2 R5.2 R7.2 U1.2 U1.4 U2.2 U2.5 U2.6 U2.8 U3.3 U4.7 U4.8 | length 181.6
  Top Layer w0.35: C4.2 -16.003,-35.781 -15.878,-35.906 -15.878,-35.956 -15.583,-36.25 U2.8 -15.021,-37.404 -14.681,-37.744 -13.513,-37.744 -12.878,-37.109 ; v1(-14.884,-32.944) -14.884,-33.321 -14.371,-33.834 U2.2 ; U2.6 -13.721,-36.85 -13.462,-37.109 -13.117,-37.109 ; U2.5 -13.071,-37.064 -13.117,-37.109 ; C3.2 -11.989,-35.857 -11.989,-36.805 -12.294,-37.109 -12.878,-37.109 ; -13.117,-37.109 -12.878,-37.109
  Top Layer w0.4: U3.3 v1(-15.9,-2.8)
  Top Layer w0.6: R2.2 C4.2 ; v1(-12.7,-5.4) -12.7,-6.1 -12.4,-6.4 R4.2 ; C3.2 R3.2 24.094,-35.806 U1.4 ; R5.2 -6.3,6.1 -5.8,6.6 v1(-5.8,9.12) -5.8,9.7 -4.2,11.3 v1(-3.4,11.3)
  Top Layer w1: v1(-4.2,-11.3) -4.2,-13.1 -3.1,-14.2 v1(1.5,-14.2) 1.851,-14.2 6.4,-18.749 v1(6.4,-23.283) 6.4,-25.8 9.1,-28.5 22.1,-28.5 24.8,-31.2 C2.2 24.8,-35.1 U1.4 U1.2
  Bottom Layer w0.3: C8.2@-3.2,10.4 C9.2 ; U4.7 -2.15,10.35 C9.2 ; U4.8 -1.75,10.85 C9.2
  Bottom Layer w0.35: v1(-14.884,-32.944) -14.884,-34.166 -13.244,-35.806 v1(-9.794,-35.806) ; R1.2 0,-12.7 v1(1.5,-14.2) 2.6,-14.2 4.2,-12.6 4.2,-8.4 3.62,-7.82 3.02,-7.82 D2.2 D3.2
  Bottom Layer w0.5: C7.2 -15.95,-3.4 -15.9,-3.35 v1(-15.9,-2.8) -15.9,-1.75 C6.2
  Bottom Layer w0.6: C8.2 v1(-3.4,11.3) ; R7.2 6.383,-23.3 v1(6.4,-23.283)
  Bottom Layer w1: C6.2 -14.55,-1.65 -14.2,-2 ; v1(-5.8,9.12) -6.88,10.2 -13.1,10.2 -15.6,7.7 -15.6,4.9 -14.2,3.5 -14.2,-2 ; v1(-4.2,-11.3) -7,-8.5 -10.1,-5.4 v1(-12.7,-5.4) -14.2,-3.9 -14.2,-2
RGB_LED: R6.2 U3.24 | length 1.6
  Top Layer w0.165: U3.24 -8.117,6.8 -7.817,7.1 R6.2
RGB_LED_DIN: LED1.4 R6.1 | length 25.8
  Top Layer w0.3: R6.1 -7.1,12.4 -1.91,17.59 LED1.4
RXD: J3.2 R8.1 U3.30 | length 32.3
  Top Layer w0.165: v1(-13.5,6.996) U3.30 ; J3.2 v1(0.5,-8.7)
  Bottom Layer w0.165: v1(-13.5,6.996) -9.196,6.996 -8.7,6.5 -8.7,2.4 -10.787,0.313 -10.787,-1.413 -9.7,-2.5 -4.8,-2.5 -1.362,-5.938 -1.362,-7.138 -0.7,-7.8 R8.1 0,-8.5 0.163,-8.663 0.463,-8.663 v1(0.5,-8.7)
SCL: R2.1 U2.4 U3.25 | length 62.7
  Top Layer w0.165: R2.1 -17.145,-32.995 -16.2,-32.05 -13.35,-32.05 -12.802,-32.598 v1(-12.802,-33.477) -13.071,-33.747 U2.4 ; v1(-9.5,6.3) U3.25
  Bottom Layer w0.165: v1(-12.802,-33.477) -12.427,-33.477 -6.5,-27.55 -6.5,-19.6 -1.95,-15.05 -1.95,-10.95 -3.35,-9.55 -3.35,-6.65 -6.05,-3.95 -10.5,-3.95 -12.25,-2.2 -12.25,2.65 -9.5,5.4 v1(-9.5,6.3)
SDA: R3.1 U2.3 U3.26 | length 60.3
  Top Layer w0.165: v1(-13.945,-33.477) -13.721,-33.701 U2.3 ; v1(-11,-33.8) -10.973,-33.827 R3.1 ; v1(-10.3,6.3) U3.26
  Bottom Layer w0.165: v1(-11,-33.8) -11,-34.383 -11.322,-34.705 -12.717,-34.705 v1(-13.945,-33.477) -13.454,-33.477 -7.15,-27.173 -7.15,-19.3 -2.5,-14.65 -2.5,-11.35 -4.15,-9.7 -4.15,-7.05 -6.8,-4.4 -11.013,-4.4 -12.8,-2.613 -12.8,3.8 v1(-10.3,6.3)
TXD: J3.3 R9.1 U3.31 | length 35.2
  Top Layer w0.165: v1(-14.3,6.996) -14.3,7 U3.31 ; v1(-0.9,-5.9) -0.5,-6.3 J3.3
  Bottom Layer w0.165: v1(-14.3,6.996) -14.3,7.7 -14.1,7.9 -8.9,7.9 -7.9,6.9 -7.9,2.4 -10.3,0 -10.3,-1 -9.25,-2.05 -4.35,-2.05 -0.9,-5.5 v1(-0.9,-5.9) R9.1
USB_D_N: J2.6 U3.17 | length 33.5
  Top Layer w0.165: U3.17 -8.407,1.393 -8.404,1.39 8.43,1.39 13.435,-3.615 17.418,-3.615 18.665,-2.368 18.665,-1.432 17.633,-0.4 J2.6
USB_D_P: J2.7 U3.18 | length 32.6
  Top Layer w0.165: U3.18 -8.283,1.683 8.551,1.683 13.556,-3.323 17.297,-3.323 18.373,-2.247 18.373,-1.553 17.81,-0.99 16.91,-0.99 J2.7
VCC: C1.2 C5.2 C12.2 C14.2 C16.2 J1.1 J1.2 J1.3 J2.1 J2.2 J3.1 LED1.2 U1.3 | length 120.6
  Top Layer w0.6: LED1.2 0.63,28.73 ; J3.1 1.663,-11.1 C14.2 3.3,-10.2 5.608,-7.892 9.532,-7.892 10.924,-6.5 11.724,-5.7 22.619,-5.7 23.5,-4.819 ; C12.2 3.3,30.4 2.6,29.7 1.6,29.7 0.63,28.73 ; v1(15.5,5.8) 14.9,5.2 C5.2 ; J2.1 16.4,4.5 C5.2 ; 0.63,28.73 0.63,26.37 1.3,25.7 1.4,25.7 3.5,23.6 3.5,13.9 12.9,4.5 v1(13.9,4.5) C5.2
  Top Layer w1: 16.3,4.1 21.3,4.1 23.5,1.9 23.5,-4.819 ; 23.5,-5.45 23.5,-11.178 25.3,-12.978 25.3,-15.8 30.2,-20.7 C1.2 30.2,-32.8 U1.3
  Bottom Layer w0.6: v1(13.9,4.5) C16.2 ; v1(15.5,5.8) 15.575,5.875 J1.1 J1.2 ; v1(18.2,4) J1.3
pads on no net: FID1.1 FID2.1 FID3.1 FID4.1 FID5.1 FID6.1 J2. J3. LED1.1 U3.4 U3.6 U3.7 U3.9 U3.10 U3.12 U3.20 U3.21 U3.23 U3.27 U3.28 U3.32 U3.33 U3.34 U3.35 U4.4 U4.5 U4.6 U4.12 U4.13
copper on no net:
  other v1: 8.5,0.5
  other v2: 0,-20.3

## Polygon pours and split planes (outlines as drawn)
GND on Bottom Layer "GND_L01_P-001" (solid, pour order 9): -19,37 -19,-41 35,-41 35,37
OUTP_R_F on Bottom Layer "GND_L01_P-001" (solid, pour order 8): -2.96,1.739 -5.042,3.486 -7.742,0.269 -5.66,-1.478
OUTN_R_F on Bottom Layer "OUTN_R_F" (solid, pour order 3): 2.885,-2.536 1.138,-0.454 -2.079,-3.154 -0.332,-5.236
OUTN_R_F on Bottom Layer "GND_L01_P-001" (solid, pour order 0): 9.074,-1.479 6.72,-2.838 8.821,-6.476 11.174,-5.117
OUTP_R_F on Bottom Layer "GND_L01_P-001" (solid, pour order 1): 12.917,0.277 10.363,-0.653 11.8,-4.6 14.354,-3.67
GND on Top Layer "GND_L01_P-001" (solid, pour order 2): -18.888,37.089 -18.888,-40.911 35.112,-40.911 35.112,37.089

## Other copper
Top Layer:
  pour cut-out: 10,15 ccw(c13,15) 13,12 ccw(c13,15) 16,15 ccw(c13,15) 13,18 ccw(c13,15)
  pour cut-out: -13,12 cw(c-13,15) -16,15 cw(c-13,15) -13,18 cw(c-13,15) -10,15 cw(c-13,15)
  pour cut-out: 27.051,-6.102 ccw(c29.027,-9.58) 32.219,-7.17 ccw(c1.182,-1.792) 32.203,3.678 ccw(c29.544,3.209) 26.885,2.74 cw(c-1.182,-2.209)
  pour cut-out: 8,-23 ccw(c11,-23) 11,-26 ccw(c11,-23) 14,-23 ccw(c11,-23) 11,-20 ccw(c11,-23)
  pour cut-out: -14,-23 ccw(c-11,-23) -11,-26 ccw(c-11,-23) -8,-23 ccw(c-11,-23) -11,-20 ccw(c-11,-23)
  text "'.Layer_Name'" at -8.08,50.665 h1.52
Bottom Layer:
  pour cut-out: -24.6,-14 ccw(c-17,-14) -17,-21.6 ccw(c-17,-14) -9.4,-14 ccw(c-17,-14) -17,-6.4 ccw(c-17,-14)
  pour cut-out: 9.4,-14 ccw(c17,-14) 17,-21.6 ccw(c17,-14) 24.6,-14 ccw(c17,-14) 17,-6.4 ccw(c17,-14)
  pour cut-out: 10.2,15 ccw(c13,15) 13,12.2 ccw(c13,15) 15.8,15 ccw(c13,15) 13,17.8 ccw(c13,15)
  pour cut-out: -15.8,15 ccw(c-13,15) -13,12.2 ccw(c-13,15) -10.2,15 ccw(c-13,15) -13,17.8 ccw(c-13,15)
  pour cut-out: -13.8,-23 ccw(c-11,-23) -11,-25.8 ccw(c-11,-23) -8.2,-23 ccw(c-11,-23) -11,-20.2 ccw(c-11,-23)
  pour cut-out: 8.2,-23 ccw(c11,-23) 11,-25.8 ccw(c11,-23) 13.8,-23 ccw(c11,-23) 11,-20.2 ccw(c11,-23)
  pour cut-out: -12.8,3.8 -12.8,0.899 -10.201,0.899 -9.05,2.05 -9.05,5.071 -9.843,5.864 -9.912,5.796 -10.804,5.796
  text "'.Layer_Name'" at -8.08,50.665 h1.52
MultiLayer:
  pour cut-out: -15.351,-33.981 -12.701,-33.981 -12.701,-36.575 -12.7,-36.576 -12.725,-36.601 -15.392,-36.601 -15.392,-33.94

## Silkscreen, mask and mechanical layers (free items; w line width, h text height)
TopOverlay:
  text "'.Layer_Name'" at -8.08,50.665 h1.52
  text "SmartSwitch D2" at -30.597,28.241 h3
  text "MainBoard" at -30.17,25.931 h1.52
  text "Version 1.2" at -30.171,23.451 h1.52
  text "05/03/2024" at -30.172,20.972 h1.52
  text "Programmer" at 20.419,6.527 h1.14 r270
  text "GND" at 7.876,1.229 h1.14
  text "UART" at 3.505,-9.771 h1.14
  text "RESET" at -10.266,-11.671 h1.14
BottomOverlay:
  circle w0.256: c-17,-14 r7.75
  circle w0.256: c17,-14 r7.75
  lines w0.4: 1.4,-12.3 3.5,-12.3 ; 1.4,-10.9 3.5,-10.9 ; 1.4,-10.4 3.5,-10.4 ; 1.4,-9 3.5,-9 ; 1.4,-8.5 3.5,-8.5 ; 1.4,-7.1 3.5,-7.1 ; 1.474,-6.62 3.574,-6.62 ; 1.474,-5.22 3.574,-5.22
  text "'.Layer_Name'" at -8.08,50.665 h1.52
  text "+" at -5.569,-1.821 h1.14
  text "-" at -1.219,-4.971 h1.14
  text "+" at 13.681,-5.071 h1.14
  text "-" at 10.681,-6.371 h1.14
  text "TXD" at 6.75,-6.82 h1.6
  text "RXD" at 6.75,-8.7 h1.6
  text "LED" at 6.75,-10.6 h1.6
  text "3.3V" at 6.75,-12.5 h1.6
  text "Speaker Left" at -14.12,-23.381 h1.14
  text "Speaker Right" at 27.951,-23.381 h1.14
TopPaste:
  text "'.Layer_Name'" at -8.08,50.665 h1.52
BottomPaste:
  text "'.Layer_Name'" at -8.08,50.564 h1.52
TopSolder:
  text "'.Layer_Name'" at -8.08,50.665 h1.52
BottomSolder:
  text "'.Layer_Name'" at -8.08,50.564 h1.52
DrillGuide:
  text "'.Layer_Name'" at -8.08,50.665 h1.52
BoardOutline:
  circle w0.8: c-17,-14 r5.5
  circle w0.8: c-11,-23 r1.6
  circle w0.8: c11,-23 r1.6
  circle w0.8: c-13,15 r1.6
  circle w0.8: c17,-14 r5.5
  circle w0.8: c13,15 r1.6
  lines w0.8: -35,-32.8 ccw(c-27,-32.8) -27,-40.8 -24,-40.8 -21,-37.8 -20,-37.8 -17,-40.8 17,-40.8 20,-37.8 21,-37.8 24,-40.8 27,-40.8 ccw(c27,-32.8) 35,-32.8 35,28.8 ccw(c27,28.8) 27,36.8 24,36.8 21,33.8 20,33.8 17,36.8 -17,36.8 -20,33.8 -21,33.8 -24,36.8 -27,36.8 ccw(c-27,28.8) -35,28.8 -35,-32.8 ; -31.021,-7.47 ccw(c-29.544,-7.21) -28.067,-6.949 cw(c0,-2) -28.067,2.949 ccw(c-29.027,5.579) -31,3.592 ccw(c0,-2) -31.021,-7.47 ; 28.067,-6.949 ccw(c0,-2) 28.067,2.949 cw(c29.544,3.209) 31.021,3.47 cw(c0,-2) 31,-7.593 cw(c29.027,-9.58) 28.067,-6.949
  text "'.Layer_Name'" at -8.08,50.665 h1.52
BoardDimensions:
  text "'.Layer_Name'" at -8.08,50.665 h1.52
BoardTitle:
  lines w0.256: -26.073,52.638 13.927,52.638 ; -9.073,49.638 -9.073,60.638 ; 13.927,55.638 -26.073,55.638 ; -26.073,55.638 -26.073,49.638 13.927,49.638 13.927,60.638 -9.073,60.638 ; -26.073,55.638 -26.073,60.638 -9.073,60.638
  text "SSD2 MainBoard" at -8.063,57.565 h1.52
  text "Project :" at -25.063,57.539 h1.52
  text "Revision :" at -25.063,53.551 h1.52
  text "1.2" at -8.063,53.348 h1.52
  text "Layer :" at -25.063,50.63 h1.52
Top Assembly:
  text "'.Layer_Name'" at -8.08,50.564 h1.52
Bottom Assembly:
  text "'.Layer_Name'" at 10.148,50.529 h1.52
Mechanical7:
  circle w0.2: c0,-2 r30
  lines w0.2: -1.414,-3.414 1.414,-0.586 ; -1.414,-0.586 1.414,-3.414 ; -28.8,-30.8 -28.8,26.8 28.8,26.8 28.8,-30.8 -28.8,-30.8 ; -23.8,-25.8 23.8,-25.8 23.8,21.8 -23.8,21.8 -23.8,-25.8
  lines w0.8: -23.8,-25.8 -23.8,-24.386 -22.386,-25.8 -23.8,-25.8 ; -23.8,20.386 -23.8,21.8 -22.386,21.8 -23.8,20.386 ; 22.386,-25.8 23.8,-25.8 23.8,-24.386 22.386,-25.8 ; 22.386,21.8 23.8,20.386 23.8,21.8 22.386,21.8
Top Courtyard:
  text "'.Layer_Name'" at -8.08,50.564 h1.52
Bottom Courtyard:
  text "'.Layer_Name'" at -8.08,50.564 h1.52
Mechanical 8:
  circle w0.2: c0,-20.3 r2.5
DrillDrawing:
  circle w0.254: c50.77,1.904 r0.635
  lines w0.181: 48.976,-8.161 143.605,-8.161 ; 48.976,6.127 143.605,6.127 ; 59.674,-11.018 59.674,8.984 ; 70.847,-11.018 70.847,8.984 ; 92.875,-11.018 92.875,8.984 ; 102.715,-11.018 102.715,8.984 ; 116.897,-11.018 116.897,8.984 ; 128.337,-11.018 128.337,8.984 ; 48.976,-11.018 143.605,-11.018 143.605,8.984 48.976,8.984 48.976,-11.018
  lines w0.254: 50.135,-6.986 50.453,-6.986 50.77,-7.304 51.088,-6.986 51.405,-6.986 51.088,-6.669 51.405,-6.351 51.088,-6.351 50.77,-6.034 50.453,-6.351 50.135,-6.351 50.453,-6.669 50.135,-6.986 ; 50.135,-4.446 51.405,-4.446 51.405,-3.176 50.135,-3.176 50.135,-4.446 ; 50.135,-0.319 51.405,-0.319 50.77,-1.589 50.135,-0.319 ; 50.135,4.126 50.77,4.444 51.405,4.126 51.088,4.761 51.405,5.396 50.77,5.079 50.135,5.396 50.453,4.761 50.135,4.126
  text "'.Layer_Name'" at -8.08,50.564 h1.52
  text "Symbol" at 50.691,6.984 h1.37
  text "Count" at 60.531,6.984 h1.37
  text "Hole Size" at 71.704,6.984 h1.37
  text "Plated" at 93.732,6.984 h1.37
  text "Hole Type" at 103.572,6.984 h1.37
  text "Via/Pad" at 117.754,6.984 h1.37
  text "Pad Shape" at 129.194,6.984 h1.37
  text "183" at 60.531,4.126 h1.14
  text "0.250mm (9.84mil)" at 71.704,4.126 h1.14
  text "PTH" at 93.732,4.126 h1.14
  text "Round" at 103.572,4.126 h1.14
  text "(Mixed)" at 117.754,4.126 h1.14
  text "Rounded" at 129.194,4.126 h1.14
  text "4" at 60.531,1.269 h1.14
  text "0.700mm (27.56mil)" at 71.704,1.269 h1.14
  text "PTH" at 93.732,1.269 h1.14
  text "Round" at 103.572,1.269 h1.14
  text "Pad" at 117.754,1.269 h1.14
  text "Rounded" at 129.194,1.269 h1.14
  text "2" at 60.531,-1.589 h1.14
  text "0.900mm (35.43mil)" at 71.704,-1.589 h1.14
  text "PTH" at 93.732,-1.589 h1.14
  text "Slot" at 103.572,-1.589 h1.14
  text "Pad" at 117.754,-1.589 h1.14
  text "Rounded" at 129.194,-1.589 h1.14
  text "1" at 60.531,-4.446 h1.14
  text "1.000mm (39.37mil)" at 71.704,-4.446 h1.14
  text "PTH" at 93.732,-4.446 h1.14
  text "Round" at 103.572,-4.446 h1.14
  text "Pad" at 117.754,-4.446 h1.14
  text "Rounded" at 129.194,-4.446 h1.14
  text "1" at 60.531,-7.304 h1.14
  text "5.050mm (198.82mil)" at 71.704,-7.304 h1.14
  text "PTH" at 93.732,-7.304 h1.14
  text "Round" at 103.572,-7.304 h1.14
  text "Via" at 117.754,-7.304 h1.14
  text "Rounded" at 129.194,-7.304 h1.14
  text "191 Total" at 60.531,-10.161 h1.14
  text "Slot definitions :" at 50.691,-13.05 h1.14
  text "Routed Path Length" at 70.541,-13.05 h1.14
  text "= Calculated from tool start centre position to tool end centre position." at 91.725,-13.05 h1.14
  text "Hole Length" at 70.541,-15.081 h1.14
  text "= Routed Path Length + Tool Size = Slot length as defined in the PCB layout" at 83.917,-15.081 h1.14

## Dimensions
-35,-32.8 to 35,-32.8 on BoardDimensions
27,36.8 to 27,-40.8 on BoardDimensions

## Text inside footprints (layer, text, board x,y; h text height)
LOGO1: TopOverlay "Jongtronics" at -32.132,-37.267 h0.8
LOGO3: BottomOverlay "Jongtronics" at -23.868,-37.267 h0.8
U3: Top Assembly "Antenna Area" at -21.595,-2.38 h0.76 r90